# Altium PCB Copy of Motor Controller.PcbDoc (part 2 of 3)
Units mm, origin at the board's own origin, x right, y up, seen from the top; angles counter-clockwise.
Board outline 52 x 52 mm, 6 copper layers (Signal 1, GND1, Signal 2, Power, GND2, Signal 3), stack 1.816 mm thick; 182 components, 97 nets, 695 pads, 1437 vias.
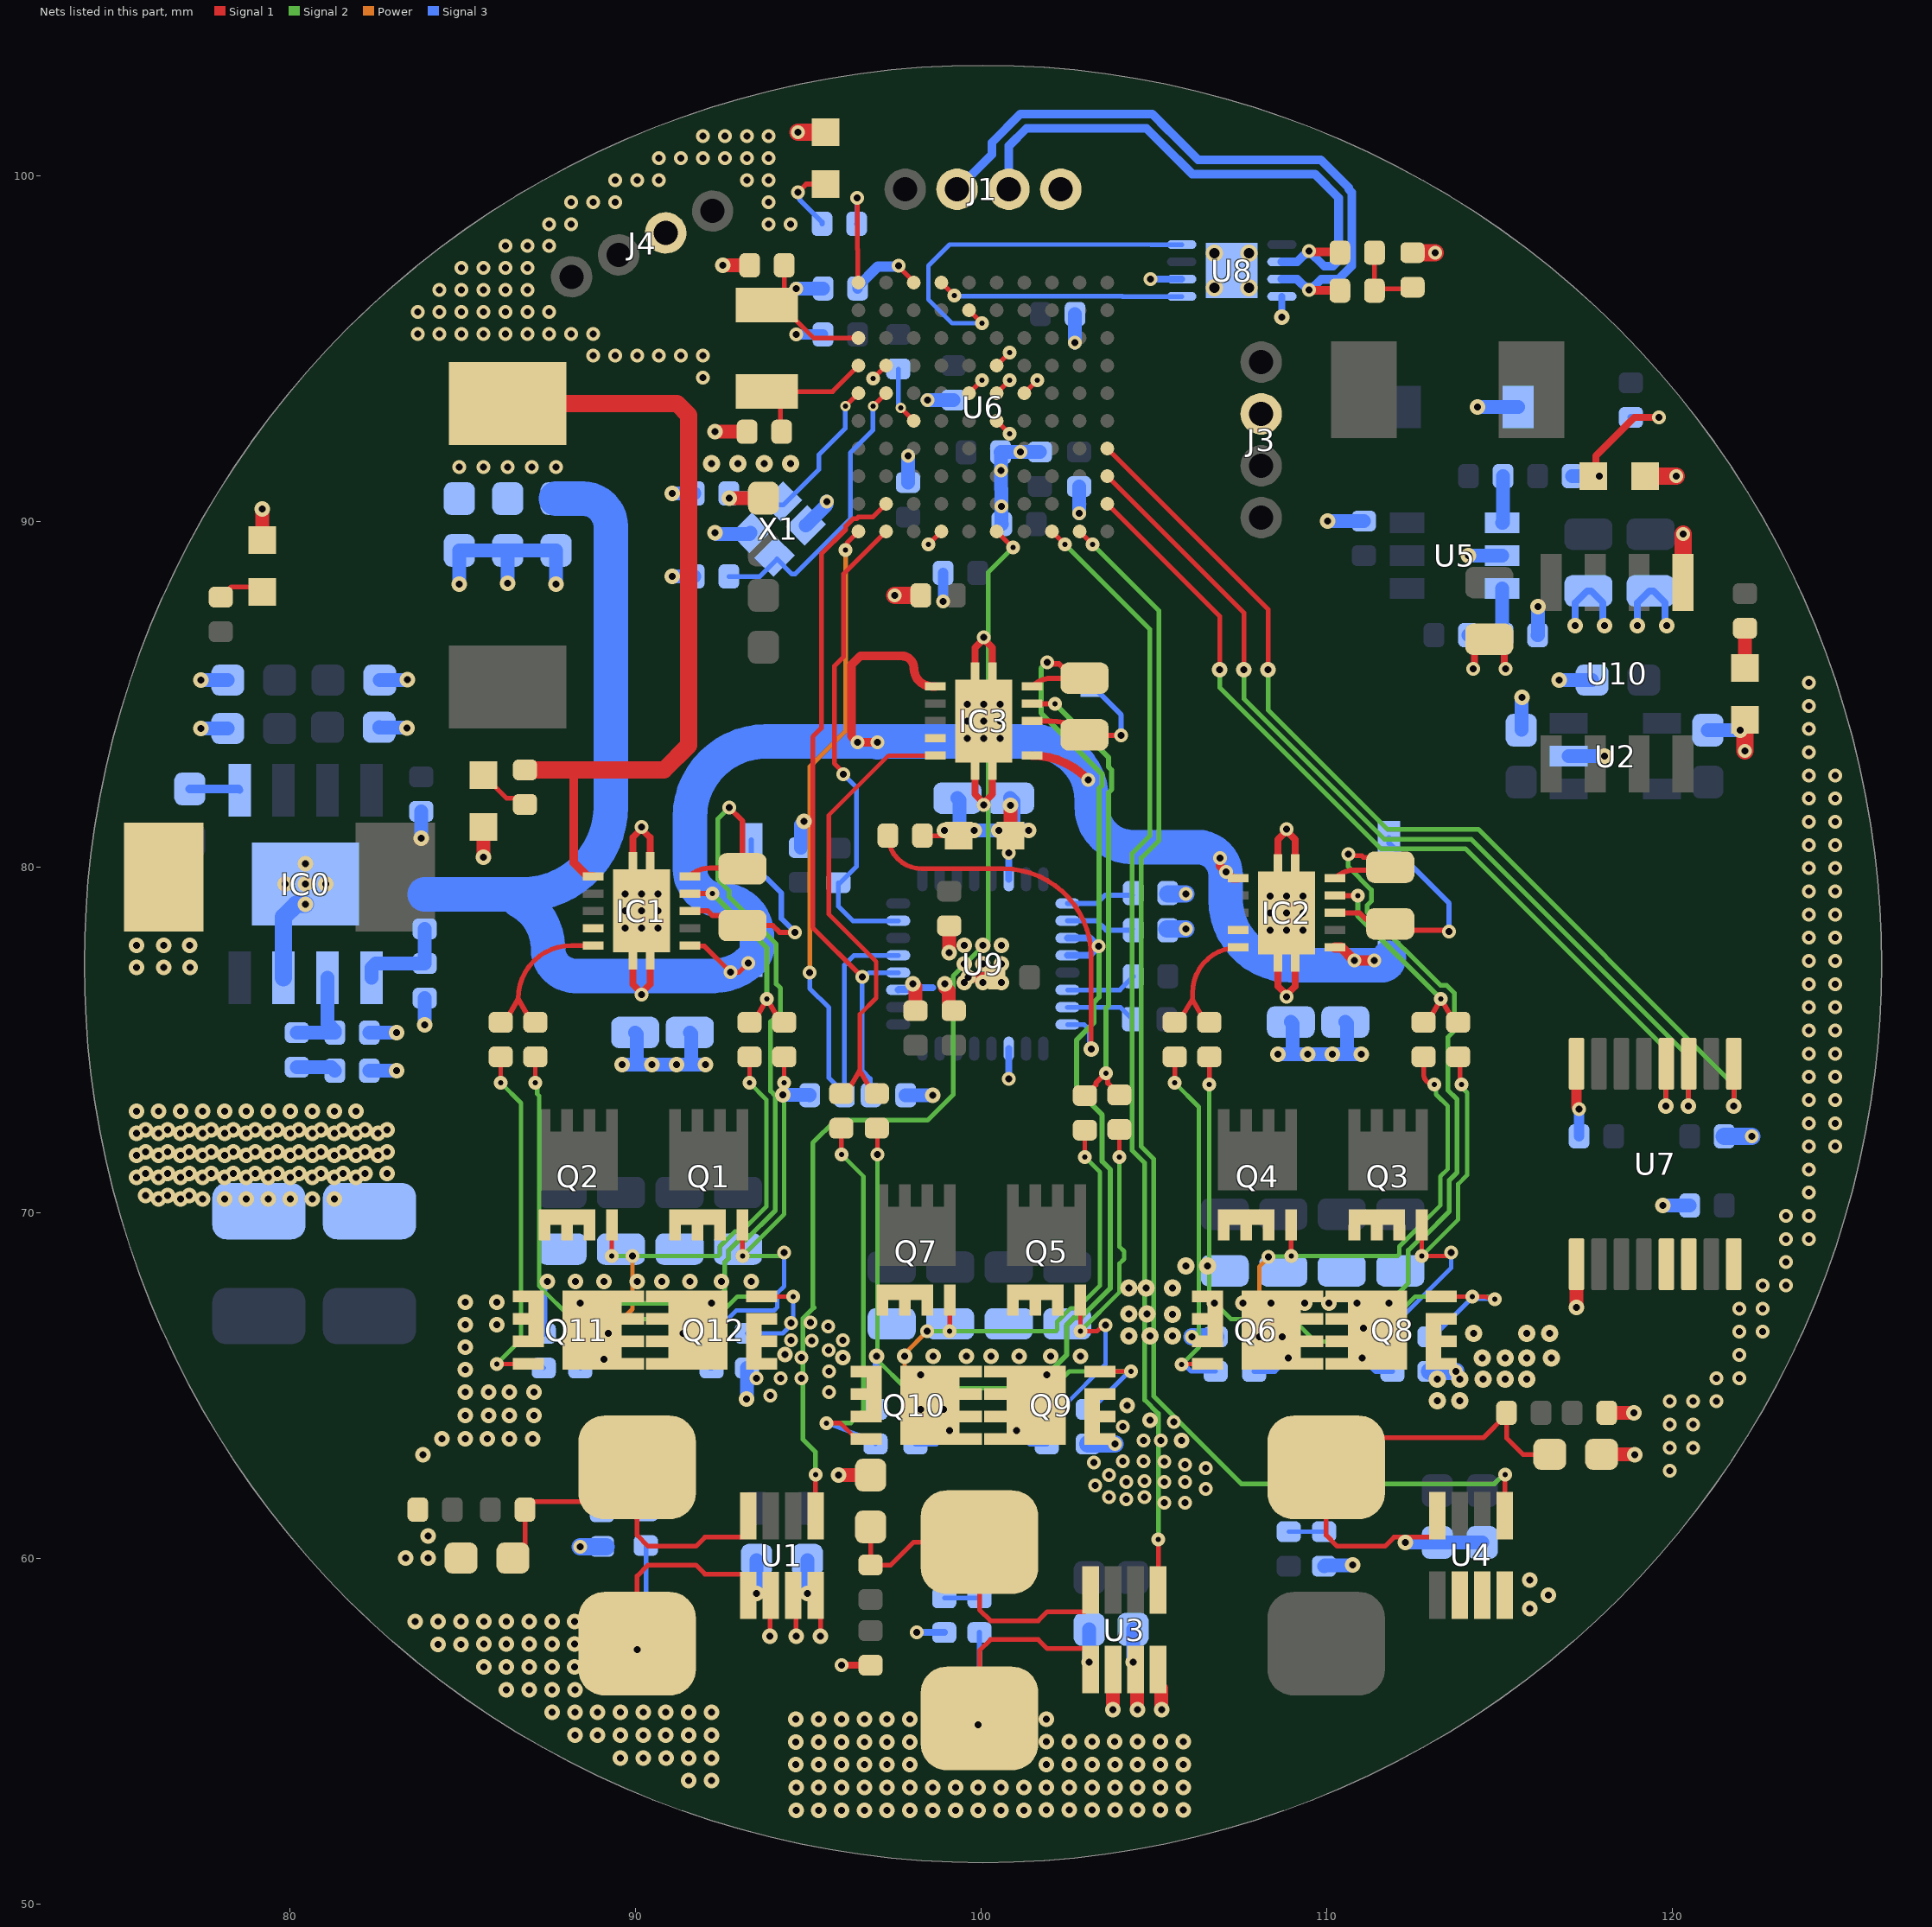
[diagram p6: the nets of this part, all layers, seen from the top]

## Via types
v1: diameter 0.45, hole 0.2, Signal 1 to Signal 3, tented both sides, 210 vias
v2: diameter 0.4, hole 0.2, Signal 1 to Signal 3, tented both sides, 204 vias
v3: diameter 0.45, hole 0.2, Signal 1 to GND1, tented both sides, 168 vias
v4: diameter 0.45, hole 0.2, GND2 to Signal 3, tented both sides, 127 vias
v5: diameter 0.4, hole 0.2, Signal 1 to GND1, tented both sides, 114 vias
v6: diameter 0.4, hole 0.2, Signal 2 to Power, tented both sides, 113 vias
v7: diameter 0.4, hole 0.2, Power to GND2, tented both sides, 100 vias
v8: diameter 0.4, hole 0.2, GND2 to Signal 3, tented both sides, 99 vias
v9: diameter 0.4, hole 0.2, GND1 to Signal 2, tented both sides, 66 vias
v10: diameter 0.4, hole 0.15, Signal 1 to GND1, tented both sides, 62 vias
v11: diameter 0.4, hole 0.15, GND1 to Signal 2, tented both sides, 49 vias
v12: diameter 0.45, hole 0.2, GND1 to Signal 2, tented both sides, 29 vias
v13: diameter 0.5, hole 0.2, Signal 1 to GND1, tented both sides, 25 vias
v14: diameter 0.5/0.5 (per signal layer), hole 0.2, GND2 to Signal 3, tented both sides, 24 vias
v15: diameter 0.45, hole 0.2, Signal 2 to Power, tented both sides, 11 vias
v16: diameter 0.4, hole 0.15, Signal 1 to Signal 3, tented both sides, 9 vias
v17: diameter 0.5, hole 0.2, Signal 1 to Signal 3, 4 vias
v18: diameter 0.5, hole 0.3, Signal 1 to Signal 3, tented both sides, 4 vias
v19: diameter 0.4, hole 0.15, GND2 to Signal 3, tented both sides, 3 vias
v20: diameter 0.3, hole 0.15, Signal 1 to Signal 3, tented both sides, 3 vias
v21: diameter 0.5/0.5 (per signal layer), hole 0.2, GND1 to Signal 2, tented both sides, 2 vias
v22: diameter 0.4, hole 0.2, Signal 1 to Signal 3, 2 vias
v23: diameter 0.4, hole 0.15, Power to GND2, tented both sides, 2 vias
v24: diameter 0.33, hole 0.15, Signal 1 to Signal 3, tented both sides, 2 vias
v25: diameter 0.35, hole 0.15, GND1 to Signal 2, tented both sides, 2 vias
v26: diameter 0.5/0.5 (per signal layer), hole 0.2, Signal 1 to GND1, tented both sides, 1 vias
v27: diameter 0.4, hole 0.2, GND1 to Signal 2, 1 vias
v28: diameter 0.4, hole 0.2, Signal 1 to GND1, 1 vias

## Nets (pads, with @x,y where several pads share a name; then routed paths per layer and width w, separated by ;. In a path a pad name is that pad's centre, name@x,y a point inside that pad or via, vN(x,y) a via of type N, cw(c..) or ccw(c..) an arc to the next point about the centre after c; other vN are vias at no path point) (continued)
+12V: C10.1 C11.1 C12.1 C13.1 C14.1 C15.1 C46.1 C47.1 C48.1 D1.2 D2.2 D3.2 IC1.1 IC1.6 IC2.1 IC2.6 IC3.1 IC3.6 L3.2 R32.2 R34.1 | length 91.5
  Signal 1 w0.138: IC1.1@91.567,77.724 91.585,77.706 91.986,77.706 v2(92.747,76.945) 92.992,76.945 v2(93.261,77.214)
  Signal 1 w0.254: 88.214,82.8 88.214,80.111 88.601,79.724 IC1.6@88.767,79.724 ; v2(97,83.597) 96.997,83.6 v2(96.419,83.6) 96.246,83.773 96.246,85.84 96.506,86.1 97.695,86.1 cw(c97.695,85.74) 98.055,85.74 ccw(c98.578,85.74) 98.578,85.217 IC3.6@98.673,85.217 ; IC3.1@101.473,83.217 cw(c101.473,80.998) 103.042,82.567 v2(103.092,82.517) ; v2(106.906,80.245) 106.906,80.029 107.269,79.666 IC2.6@107.435,79.666
  Signal 1 w0.3: IC2.1@110.235,77.666 110.415,77.666 v2(110.792,77.289) v2(111.368,77.289)
  Signal 1 w0.5: L3.2@86.3,93.4 91.2,93.4 91.54,93.06 91.54,83.517 90.823,82.8 88.214,82.8 R32.2@86.8,82.8
  Signal 3 w1: R34.1@83.9,79.2 86.741,79.2 ccw(c86.741,81.74) 89.281,81.74 89.281,89.839 ccw(c88.47,89.839) 88.47,90.65 C46.1@87.7,90.65 ; 86.64,79.013 cw(c85.896,77.629) 87.467,77.629 ccw(c88.252,77.629) 88.252,76.844 C10.1@89.986,76.844 C11.1@91.567,76.844 92.263,76.844 ccw(c92.263,78.374) D1.2@93.345,77.292 ccw(c92.94,77.697) 93.513,77.697 93.513,78.014 ccw(c92.495,78.014) 92.495,79.032 cw(c92.495,79.96) 91.567,79.96 91.567,81.424 cw(c93.767,81.424) 93.767,83.624 96.973,83.624 v2(97,83.597) 97.027,83.624 C15.1@99.314,83.624 C14.1@100.838,83.624 101.496,83.624 cw(c101.496,81.92) D3.2@103.2,81.92 103.2,81.736 ccw(c104.369,81.736) 104.369,80.567 106.255,80.567 cw(c106.255,79.747) 107.074,79.747 107.074,79.033 ccw(c108.96,79.033) C13.1@108.96,77.147 C12.1@110.535,77.147 111.587,77.147 ccw(c111.587,77.36) D2.2@111.8,77.36
  other v2: 107.088,79.847 84.9,91.567 85.598,91.567 86.3,91.567 86.995,91.567 87.7,91.567
BOOT: C49.1 IC0.1 | length 1.5
  Signal 3 w0.2: IC0.1@78.507,82.25 IC0.1@78.545,82.212
  Signal 3 w0.254: C49.1@77.1,82.25 IC0.1@78.507,82.25
CAN_N: J1.3 R26.2 U8.6 | length 16.6
  Signal 1 w0.254: v22(109.489,97.81) 109.512,97.787 110.356,97.787 R26.2@110.379,97.765
  Signal 3 w0.254: J1.3@100.8,99.6 100.8,100.856 101.308,101.364 104.777,101.364 105.22,100.92 106.101,100.04 109.651,100.04 110.34,99.351 110.34,97.539 110.178,97.377 109.922,97.377 v22(109.489,97.81) 109.45,97.81 109.142,97.502 108.702,97.502 U8.6@108.7,97.5
CAN_P: J1.2 R24.1 U8.7 | length 19
  Signal 1 w0.254: v22(109.489,96.69) 109.502,96.677 110.366,96.677 R24.1@110.379,96.665
  Signal 3 w0.254: J1.2@99.3,99.6 100.309,100.609 100.309,100.95 101.136,101.778 104.948,101.778 105.392,101.334 105.513,101.213 106.272,100.454 109.823,100.454 110.633,99.644 110.633,99.597 110.721,99.509 110.721,97.381 110.336,96.996 109.834,96.996 109.529,96.69 v22(109.489,96.69) 109.45,96.69 109.142,96.998 108.702,96.998 U8.7@108.7,97
CAN_RX: U6.B5 U8.4 | length 10.9
  Signal 1 w0.138: U6.B5@99.647,96.1 v16(100.024,95.723)
  Signal 3 w0.127: v16(100.024,95.723) 99.155,95.723 98.47,96.408 98.47,97.386 99.083,98 104.921,98
  Signal 3 w0.138: 104.921,98 U8.4@105.8,98
CAN_TX: U6.A4 U8.1 | length 7.1
  Signal 1 w0.138: U6.A4@98.847,96.9 v16(99.224,96.523)
  Signal 3 w0.138: v16@99.224,96.511 104.078,96.511 104.09,96.5 U8.1@105.8,96.5
CB1: C53.2 U5.1 | length 1.4
  Signal 3 w0.4: U5.1@115.075,89.95 ccw(c115.075,89.975) 115.1,89.975 C53.2@115.1,91.3
COMP: C57.1 IC0.6 R35.1 | length 2.8
  Signal 3 w0.4: R35.1@80.2,75.2 C57.1@81.3,75.2 81.3,75.25 81.085,75.465 IC0.6@81.085,76.788
CS: R45.2 U6.K2 U9.23 | length 13.9
  Signal 1 w0.138: v2(96.012,82.677) 96.012,82.727 95.75,82.99 95.75,85.801 96.012,86.063 96.012,88.465 96.87,89.323 U6.K2@97.247,89.7
  Signal 3 w0.138: v2(96.012,82.677) 96.388,82.301 96.388,80.002 95.919,79.533 R45.2@95.869,79.533 95.869,78.855 96.288,78.437 U9.23@97.597,78.437
FAULT: R31.2 U6.A1 | length 3.2
  Signal 1 w0.138: v2(96.41,99.35) 96.41,97.875 96.428,97.856 96.428,96.919 U6.A1@96.447,96.9
  Signal 3 w0.138: R31.2@96.393,98.6 96.401,98.608 96.401,99.342 v2(96.41,99.35)
FB: IC0.5 R34.2 R37.1 | length 2.9
  Signal 3 w0.4: IC0.5@82.355,76.788 82.355,77.075 82.48,77.2 R37.1@83.9,77.2 R34.2@83.9,78.2
FB1: R27.2 R28.1 U5.3 | length 2.4
  Signal 3 w0.4: R27.2@114.1,86.7 R28.1@115.1,86.7 cw(c115.1,86.725) 115.075,86.725 U5.3@115.075,88.05
GND: C4.2 C5.2 C6.2 C7.2 C8.2 C9.2 C10.2 C11.2 C12.2 C13.2 C14.2 C15.2 C16.2 C17.2 C18.2 C19.2 C20.2 C21.2 C22.2 C23.2 C24.2 C25.2 C26.2 C27.1 C28.1 C29.2 C30.1 C31.2 C32.2 C33.2 C34.2 C35.2 C36.1 C37.2 C38.1 C39.2 C40.2 C41.2 C42.2 C43.2 C44.2 C45.2 C46.2 C47.2 C48.2 C50.2 C51.2 C52.2 C54.2 C55.2 C56.2 C57.2 C58.2 C59.2 C60.1 C61.1 C62.1 C63.1 C64.1 C65.1 C66.1 C67.2 C68.2 C69.2 C70.2 C71.2 C72.2 C73.2 C74.2 C75.2 C76.2 C77.2 D4.2 D5.2 DS1.2 DS2.2 DS3.2 DS4.2 DS5.2 DS6.2 IC0.7 IC0.9 IC1.9 IC1.11 IC1.12 IC1.13 IC1.14 IC1.15 IC2.9 IC2.11 IC2.12 IC2.13 IC2.14 IC2.15 IC3.9 IC3.11 IC3.12 IC3.13 IC3.14 IC3.15 J1.4 J3.3 J4.3 Q6.1 Q6.2 Q6.3 Q6.10 Q8.1 Q8.2 Q8.3 Q8.10 Q9.1 Q9.2 Q9.3 Q9.10 Q10.1 Q10.2 Q10.3 Q10.10 Q11.1 Q11.2 Q11.3 Q11.10 Q12.1 Q12.2 Q12.3 Q12.10 R17.2 R19.2 R21.2 R28.2 R33.1 R36.2 R37.2 R38.1 R42.2 R43.2 R44.2 R49.1 R50.1 R53.1 R54.1 R57.1 R58.1 U1.2 U1.3 U1.4 U2.2 U3.2 U3.3 U3.4 U4.2 U4.3 U4.4 U5.2 U6.D2 U6.D6 U6.E5 U6.E6 U6.E7 U6.F6 U6.K4 U7.9 U8.2 U8.8 U8.9 U9.3 U9.4 U9.11 U9.19 U9.30 U9.EPAD U10.1 X1.2 X1.4 | length 123.6
  Signal 1 w0.138: v3(93.89,57.732) 93.89,58.902 U1.2@93.909,58.921 ; U1.3@94.559,58.921 94.644,58.836 v3(94.644,57.732) ; U1.4@95.209,58.921 95.348,58.782 v3(95.348,57.732) ; v10(96.87,94.123) U6.D2@97.247,94.5 ; v10(98.47,89.323) U6.K4@98.847,89.7 ; U6.E5@99.647,93.7 v10(100.024,94.077) ; U6.F6@100.447,92.9 v10(100.824,92.523) ; U6.E6@100.447,93.7 v10(100.824,94.077) ; U6.D6@100.447,94.5 v10(100.824,94.877) ; U6.E7@101.247,93.7 v10(101.624,94.077)
  Signal 1 w0.2: IC1.15@89.917,77.274 89.917,76.602 v5@90.167,76.352 ; IC1.14@89.917,80.174 89.917,80.846 v5@90.167,81.096 ; v5(90.167,76.298) v5@90.167,76.352 ; v5(90.167,81.15) v5@90.167,81.096 ; IC1.12@90.417,77.274 90.417,76.602 v5@90.167,76.352 ; IC1.13@90.417,80.174 90.417,80.846 v5@90.167,81.096 ; v5(95.959,56.9) R19.2@96.8,56.9 ; IC3.15@99.823,82.767 99.823,82.095 v5@100.073,81.845 ; IC3.14@99.823,85.667 99.823,86.339 v5@100.073,86.589 ; v5(100.073,81.791) v5@100.073,81.845 ; v5(100.073,86.643) v5@100.073,86.589 ; IC3.12@100.323,82.767 100.323,82.095 v5@100.073,81.845 ; IC3.13@100.323,85.667 100.323,86.339 v5@100.073,86.589 ; IC2.15@108.585,77.216 108.585,76.544 v5@108.835,76.294 ; IC2.14@108.585,80.116 108.585,80.788 v5@108.835,81.038 ; v5(108.835,76.24) v5@108.835,76.294 ; v5(108.835,81.092) v5@108.835,81.038 ; IC2.12@109.085,77.216 109.085,76.544 v5@108.835,76.294 ; IC2.13@109.085,80.116 109.085,80.788 v5@108.835,81.038 ; v5(114.232,85.725) 114.271,85.763 114.271,86.235 114.616,86.58 114.784,86.58 115.129,86.235 115.129,85.763 v5(115.167,85.725)
  Signal 1 w0.3: v3(99.621,76.8) C64.1@100.4,76.8
  Signal 1 w0.4: DS3.2@79.2,89.45 v3(79.2,90.35) ; v3(85.6,80.271) DS5.2@85.6,81.15 ; v3(92.3,92.585) 92.302,92.583 C38.1@93.226,92.583 ; v3(92.521,97.4) C37.2@93.3,97.4 ; v3(92.71,90.665) R38.1@93.702,90.665 ; v3(95.871,62.4) C40.2@96.8,62.4 ; v3(98.028,76.612) 98.028,76.599 98.1,76.526 C62.1@98.1,75.833 ; v3(98.943,76.609) 98.953,76.599 98.953,76.508 99.057,76.404 99.057,75.933 99.157,75.833 C61.1@99.207,75.833 ; v3(99.073,77.51) 99.074,77.512 99.074,78.288 C63.1@99.076,78.289 ; DS6.2@100.85,80.9 v3(100.85,81.779) ; v3(103.815,55.61) U3.2@103.815,56.774 ; U3.3@104.465,56.774 104.505,56.734 104.505,55.637 104.519,55.624 v3(104.519,55.61) ; U3.4@105.115,56.774 105.115,56.329 105.213,56.231 105.213,55.62 v3(105.223,55.61) ; v3(117.225,67.246) U7.9@117.225,68.5 ; C41.2@117.95,63 117.954,62.996 118.9,62.996 v3(118.904,62.992) ; R21.2@118.1,64.2 v3(118.879,64.2)
  Signal 1 w0.5: v5(94.7,101.25) DS4.2@95.5,101.25 ; v5(97.499,87.85) C25.2@98.253,87.85 ; C45.2@112.479,97.765 v5(113.136,97.765) ; DS2.2@119.204,91.304 v5(120.104,91.304) ; U10.1@120.305,88.23 v5(120.305,89.62) ; v5(122.1,83.35) DS1.2@122.1,84.25
  Signal 3 w0.2: R50.1@87.341,66.498 87.341,67.829 87.447,67.935 v4(87.447,68.003) ; R53.1@96.942,64.3 96.957,64.315 96.957,65.829 v4(96.972,65.844) ; U9.19@97.597,76.437 97.616,76.456 98.006,76.456 98.05,76.5 98.6,76.5 ; v8(98.129,57.845) C70.2@98.933,57.845 ; v8(100.797,73.865) U9.11@100.797,74.737 ; U9.30@100.797,79.637 v8(100.797,80.4) ; U9.4@102.497,77.437 103.134,77.437 v8(103.393,77.696) 103.388,77.696 103.147,77.937 U9.3@102.497,77.937 ; v8(104.896,97) U8.2@105.8,97 ; v4(108.7,95.896) U8.8@108.7,96.5 ; C19.2@115.625,83.95 C19.2@115.637,83.963 ; v4@115.637,84.892 v4(115.65,84.904) ; v4(117.19,86.979) 117.19,87.635 117.535,87.98 C44.2@117.569,87.98 117.644,87.98 117.989,87.635 117.989,87.027 v4(118.037,86.979) ; v4(118.99,86.979) 118.99,87.635 119.335,87.98 C43.2@119.369,87.98 119.444,87.98 119.789,87.635 119.789,87.027 v4(119.837,86.979)
  Signal 3 w0.3: v8(94.643,95.4) C28.1@95.421,95.399 ; C30.1@98.9,88.5 98.901,88.499 98.901,87.672 v8(98.902,87.671)
  Signal 3 w0.4: v4(77.421,84) C52.2@78.2,84 ; v4(77.421,85.4) C51.2@78.2,85.4 ; C58.2@82.3,74.1 v4(83.079,74.1) ; C57.2@82.3,75.2 v4(83.079,75.2) ; C50.2@82.581,84.036 82.591,84.027 83.37,84.027 v4(83.379,84.018) ; C56.2@82.6,85.4 82.606,85.406 83.385,85.406 v4(83.392,85.413) ; v4(83.8,80.821) R36.2@83.8,81.6 ; v4(83.9,75.421) R37.2@83.9,76.2 ; v4(84.9,88.171) C48.2@84.9,89.15 C47.2@86.3,89.15 ; v4(86.3,88.2) C47.2@86.3,89.15 ; v4(87.7,88.171) C46.2@87.7,89.15 C47.2@86.3,89.15 ; v4(89.611,74.27) 90.04,74.27 ; C10.2@89.986,75.204 90.04,75.15 90.04,74.27 ; v4(91.059,88.4) C36.1@91.7,88.4 ; v4(91.059,90.805) 91.062,90.802 91.698,90.802 C35.2@91.7,90.8 ; C11.2@91.567,75.204 91.605,75.166 91.605,74.27 ; v4(92.024,74.27) 91.605,74.27 ; v4(92.3,89.662) 92.314,89.662 92.349,89.627 93.293,89.627 X1.2@93.328,89.662 ; v4(93.211,64.6) 93.218,64.606 93.218,65.492 R49.1@93.224,65.498 ; v4(93.499,58.981) C16.2@93.499,59.935 ; v4(94.261,73.4) 94.267,73.395 95.035,73.395 R43.2@95.04,73.389 ; v8(94.646,96.731) R33.1@95.425,96.731 ; R42.2@94.782,80.554 94.782,81.212 94.869,81.298 v4(94.869,81.312) ; X1.4@94.926,89.875 95.523,90.472 95.523,90.558 v8(95.533,90.568) ; v4(94.969,58.981) C17.2@94.969,59.935 ; R44.2@97.815,73.389 v4(98.6,73.389) ; C29.2@97.883,91.114 v8(97.883,91.893) ; v8(98.448,93.5) C34.2@99.2,93.5 ; v4(98.939,81.05) 99.368,81.05 ; C15.2@99.314,81.984 99.368,81.93 99.368,81.05 ; C27.1@100.592,89.916 100.582,89.926 100.582,90.922 100.567,90.937 100.567,91.984 C33.2@100.561,91.99 100.566,91.995 101.695,91.995 C26.2@101.7,92 ; C14.2@100.838,81.984 100.933,81.889 100.933,81.077 ; v4(101.374,81.053) 101.365,81.063 100.947,81.063 100.933,81.077 ; v8(102.715,95.163) C31.2@102.715,95.992 ; v8(102.833,90.221) C32.2@102.833,91 ; v4(103.124,56.982) C23.2@103.124,57.936 ; v4(104.394,56.982) C24.2@104.394,57.936 ; v4(108.585,74.573) 109.014,74.573 ; C13.2@108.96,75.507 109.014,75.453 109.014,74.573 ; C71.2@109.919,59.762 109.948,59.79 110.739,59.79 v4(110.748,59.8) ; v4(110.022,90) C55.2@111.072,90 ; C12.2@110.535,75.507 110.579,75.463 110.579,74.573 ; v4(110.998,74.573) 110.579,74.573 ; v4(112.269,60.451) C21.2@113.198,60.451 C22.2@114.5,60.45 ; v4(114.096,89) U5.2@115.075,89 ; v4(114.356,93.3) D5.2@115.535,93.3 ; C19.2@115.637,83.963 v4@115.637,84.892 ; R28.2@116.1,86.7 116.106,86.706 116.106,87.523 v4(116.113,87.529) ; v4(116.721,85.4) C18.2@117.675,85.4 ; U2.2@117,83.2 v4(118.029,83.2) ; C54.2@117.1,91.3 117.102,91.302 117.877,91.302 v4(117.879,91.304) ; v4(119.721,70.2) C60.1@120.5,70.2 ; C20.2@121.025,83.95 v4(121.954,83.95) ; 90.04,74.27 v4(90.469,74.27) v4(91.187,74.27) 91.605,74.27 ; 99.368,81.05 99.797,81.05 v4(100.515,81.05) 100.524,81.06 100.916,81.06 100.933,81.077 ; 109.014,74.573 109.443,74.573 v4(110.161,74.573) 110.579,74.573
  Signal 3 w0.5: IC0.7@79.815,76.788 79.815,78.55 80.175,78.91 v4(80.45,78.91) ; v8(88.4,60.325) C69.2@89.145,60.325 ; R54.1@103.089,63.3 v8(103.866,63.3) ; C65.1@105.369,78.197 v8(105.918,78.197) ; C66.1@105.398,79.208 v8(105.918,79.208) ; v8(106.096,66.4) R58.1@106.783,66.4 ; R57.1@112.973,65.4 v8(113.736,65.4) ; C59.2@121.5,72.2 v8(122.3,72.2)
  other v2: 119.928,62.522 119.928,63.192 120.599,63.192 119.928,63.863 120.599,63.863 119.928,64.534 120.599,64.534 121.269,64.534 121.269,65.204 121.94,65.204 121.94,65.875 121.94,66.546 122.611,66.546 121.94,67.216 122.611,67.216 122.611,67.887 123.281,67.887 123.281,68.558 123.281,69.228 123.952,69.228 123.281,69.899 123.952,69.899 123.952,70.57 123.952,71.24 123.952,71.911 124.714,71.911 123.952,72.581 124.714,72.581 123.952,73.252 124.714,73.252 123.952,73.923 124.714,73.923 123.952,74.593 124.714,74.593 123.952,75.264 124.714,75.264 123.952,75.935 124.714,75.935 123.952,76.605 124.714,76.605 123.952,77.276 124.714,77.276 123.952,77.947 124.714,77.947 123.952,78.617 124.714,78.617 123.952,79.288 124.714,79.288 123.952,79.959 124.714,79.959 123.952,80.629 124.714,80.629 123.952,81.3 124.714,81.3 123.952,81.971 124.714,81.971 123.952,82.641 124.714,82.641 123.952,83.312 123.952,83.983 123.952,84.653 123.952,85.324 91.948,94.147 88.773,94.782 89.408,94.782 90.043,94.782 90.678,94.782 91.313,94.782 91.948,94.782 83.693,95.417 84.328,95.417 84.963,95.417 85.598,95.417 86.233,95.417 86.868,95.417 87.503,95.417 88.138,95.417 88.773,95.417 83.693,96.052 84.328,96.052 84.963,96.052 85.598,96.052 86.233,96.052 86.868,96.052 87.503,96.052 84.328,96.687 84.963,96.687 85.598,96.687 86.233,96.687 86.868,96.687 84.963,97.322 85.598,97.322 86.233,97.322 86.868,97.322 86.233,97.957 86.868,97.957 87.503,97.957 87.503,98.592 88.138,98.592 93.853,98.592 94.488,98.592 88.138,99.227 88.773,99.227 89.408,99.227 93.853,99.227 89.408,99.862 90.043,99.862 90.678,99.862 93.218,99.862 93.853,99.862 90.678,100.497 91.313,100.497 91.948,100.497 92.583,100.497 93.218,100.497 93.853,100.497 91.948,101.132 92.583,101.132 93.218,101.132 93.853,101.132
  other v3: 115.873,58.534 116.409,58.929 115.873,59.366 83.35,60 84,60 84,60.633 83.85,62.992 105.8,63.4 84.4,63.454 85.07,63.454 85.715,63.454 86.35,63.454 87.025,63.454 104.881,63.983 85.075,64.121 85.746,64.121 86.35,64.121 87.056,64.121 104.225,64.416 85.075,64.8 85.746,64.8 86.35,64.8 87.056,64.8 85.075,65.448 96,65.8 94.323,65.886 85.075,66.101 85.075,66.748 85.978,66.748 85.075,67.398 85.978,67.398 76.2,70.383 76.835,70.383 77.47,70.383 78.105,70.383 78.74,70.383 79.375,70.383 80.01,70.383 80.645,70.383 81.28,70.383 75.565,71.018 76.2,71.018 76.835,71.018 77.47,71.018 78.105,71.018 78.74,71.018 79.375,71.018 80.01,71.018 80.645,71.018 81.28,71.018 81.915,71.018 75.565,71.653 76.2,71.653 76.835,71.653 77.47,71.653 78.105,71.653 78.74,71.653 79.375,71.653 80.01,71.653 80.645,71.653 81.28,71.653 81.915,71.653 82.55,71.653 75.565,72.288 76.2,72.288 76.835,72.288 77.47,72.288 78.105,72.288 78.74,72.288 79.375,72.288 80.01,72.288 80.645,72.288 81.28,72.288 81.915,72.288 82.55,72.288 75.565,72.923 76.2,72.923 76.835,72.923 77.47,72.923 78.105,72.923 78.74,72.923 79.375,72.923 80.01,72.923 80.645,72.923 81.28,72.923 81.915,72.923 75.565,77.089 76.342,77.089 77.111,77.089 75.565,77.724 76.342,77.724 77.1,77.724 108.36,78.166 108.835,78.166 109.31,78.166 89.692,78.224 90.167,78.224 90.642,78.224 108.36,78.666 108.835,78.666 109.31,78.666 89.692,78.724 90.167,78.724 90.642,78.724 108.36,79.153 108.835,79.153 109.31,79.153 89.692,79.211 90.167,79.211 90.642,79.211 99.598,83.717 100.073,83.717 100.548,83.717 99.598,84.217 100.073,84.217 100.548,84.217 99.598,84.704 100.073,84.704 100.548,84.704
  other v4: 97.79,65.844 98.607,65.844 99.575,65.844 100.279,65.844 101.092,65.844 102.014,65.844 102.877,65.844 106.751,67.374 107.569,67.374 108.386,67.374 109.354,67.374 110.058,67.374 110.871,67.374 111.793,67.374 88.265,68.003 89.082,68.003 90.05,68.003 90.754,68.003 91.567,68.003 92.489,68.003 93.352,68.003 75.819,70.485 76.454,70.485 77.089,70.485 75.819,71.12 76.454,71.12 77.089,71.12 77.724,71.12 78.359,71.12 78.994,71.12 79.629,71.12 80.264,71.12 80.899,71.12 81.534,71.12 82.169,71.12 82.804,71.12 75.819,71.755 76.454,71.755 77.089,71.755 77.724,71.755 78.359,71.755 78.994,71.755 79.629,71.755 80.264,71.755 80.899,71.755 81.534,71.755 82.169,71.755 82.804,71.755 75.819,72.39 76.454,72.39 77.089,72.39 77.724,72.39 78.359,72.39 78.994,72.39 79.629,72.39 80.264,72.39 80.899,72.39 81.534,72.39 82.169,72.39 82.804,72.39 109.443,74.573 99.511,76.645 100.05,76.645 100.59,76.645 99.511,77.185 100.05,77.185 100.59,77.185 99.511,77.724 100.05,77.724 100.59,77.724 79.86,79.5 80.45,79.5 81.04,79.5 80.45,80.09 99.797,81.05
  other v5: 105.3,61.6 105.9,61.6 104.202,61.702 103.695,61.766 104.722,61.766 106.5,62 103.3,62.1 104.2,62.2 105.3,62.2 105.9,62.2 104.719,62.219 103.7,62.4 106.5,62.6 105.9,62.7 103.26,62.766 104.1,62.8 104.7,62.8 105.292,62.792 104.7,63.4 105.2,63.4 104.1,63.8 105.566,63.943 93.9,64.7 95.6,64.8 93.5,65.2 94.2,65.2 94.8,65.2 95.6,65.4 94.8,65.8 95.58,66.016 94.5,66.3 95.102,66.284 96,66.3 95.575,66.699 94.5,66.8 95.06,66.81
  other v8: 100.582,90.424 100.567,91.461 101.131,91.995
  other v13: 113.198,64.55 113.848,64.55 113.198,65.171 113.848,65.171 114.528,65.171 115.159,65.171 115.787,65.171 114.503,65.788 115.159,65.788 115.787,65.788 116.5,65.788 104.267,66.421 104.881,66.427 105.537,66.421 114.25,66.5 115.787,66.5 116.45,66.5 104.277,67.066 104.799,67.066 105.537,67.056 104.267,67.818 104.775,67.818 105.537,67.818 105.918,68.453 106.553,68.453
  other v17: 92.202,91.669 92.964,91.669 93.726,91.669 94.488,91.669
  other v18: 106.75,96.75 107.75,96.75 106.75,97.75 107.75,97.75
HAL_A/ENC_A: U6.G10 U7.1 | length 29.3
  Signal 1 w0.138: U6.G10@103.647,92.1 108.3,87.447 v1(108.3,85.7) ; v1(121.775,73.071) U7.1@121.775,74.3
  Signal 2 w0.138: v1(108.3,85.7) 108.3,84.534 111.747,81.087 114.381,81.087 121.775,73.692 v1(121.775,73.071)
HAL_A/ENC_A/IN: U7.16
HAL_B/ENC_B: U6.H10 U7.3 | length 27.9
  Signal 1 w0.138: U6.H10@103.647,91.3 107.6,87.347 v1(107.6,85.7) ; v1(120.455,73.071) 120.465,73.081 120.465,74.29 U7.3@120.475,74.3
  Signal 2 w0.138: v1(107.6,85.7) 107.6,84.859 111.67,80.79 114.182,80.79 120.455,74.516 v1(120.455,73.071)
HAL_B/ENC_B/IN: U7.14
HAL_C/ENC_I: U6.J10 U7.4 | length 26.8
  Signal 1 w0.138: U6.J10@103.647,90.5 106.9,87.247 v1(106.9,85.7) ; v1(119.805,73.071) 119.815,73.081 119.815,74.29 U7.4@119.825,74.3
  Signal 2 w0.138: v1(106.9,85.7) 106.9,85.185 111.56,80.525 114.006,80.525 119.805,74.726 v1(119.805,73.071)
HAL_C/ENC_I/IN: U7.13
HO1: IC1.4 R1.2 R3.2 | length 6.1
  Signal 1 w0.151: IC1.4@91.567,79.224 v10(92.226,79.224) ; R3.2@93.3,75.5 93.5,75.65 v11(93.8,76.174) 94.1,75.65 R1.2@94.3,75.5
  Signal 2 w0.151: v10(92.226,79.224) 93.8,77.649 v11(93.8,76.174)
  other v10: 93.8,76.174
  other v11: 92.226,79.224
HO2: IC3.4 R9.2 R10.2 | length 13.8
  Signal 1 w0.151: IC3.4@101.473,84.717 v11(102.132,84.717) ; R10.2@103.001,73.379 103.011,73.379 103.321,73.689 103.321,73.749 103.592,74.02 v10(103.615,74.02) 103.662,73.973 103.662,73.738 103.771,73.629 103.771,73.619 103.99,73.4 R9.2@104,73.4
  Signal 2 w0.151: v11(102.132,84.717) 103.688,83.161 103.688,82.884 103.772,82.799 103.772,82.235 103.688,82.15 103.688,75.987 103.615,75.914 v10(103.615,74.02)
  other v10: 102.132,84.717
  other v11: 103.615,74.02
HO3: IC2.4 R2.2 R4.2 | length 6.4
  Signal 1 w0.151: IC2.4@110.235,79.166 v11(110.894,79.166) ; R4.2@112.8,75.5 113,75.65 v10(113.3,76.174) 113.6,75.65 R2.2@113.8,75.5
  Signal 2 w0.151: v11(110.894,79.166) 110.894,78.58 v10(113.3,76.174)
  other v10: 110.894,79.166
  other v11: 113.3,76.174
HS1: C1.1 C39.1 IC1.5 Q1.1 Q1.2 Q1.3 Q1.10 Q2.1 Q2.2 Q2.3 Q2.10 Q11.5 Q11.6 Q11.7 Q11.8 Q11.9 Q12.5 Q12.6 Q12.7 Q12.8 Q12.9 R13.2 R16.1 R47.1 R48.1 U1.8 | length 37
  Signal 1 w0.138: C39.1@86.45,60 86.45,60.06 86.8,60.41 R16.1@86.8,61.4 ; R16.1@86.8,61.406 87.025,61.631 89.053,61.631 R13.2@90.043,62.621 90.043,60.662 90.363,60.342 91.743,60.342 92.006,60.605 93.088,60.605 93.259,60.776 U1.8@93.259,61.221
  Signal 1 w0.151: IC1.5@91.567,79.724 cw(c92.144,79.147) 92.144,79.963 C1.1@93.082,79.963 ; v2(92.71,81.712) 93.091,81.331 C1.1@93.091,79.941
  Signal 2 w0.138: v2(88.4,67.374) v2(92.2,67.374) 92.58,67.754 92.58,68.56 92.695,68.675 92.695,68.903 92.983,69.191 93.176,69.191 94.041,70.055 94.041,73.372 93.904,73.509 93.904,75.514 94.196,75.806 94.196,76.487 94.072,76.611 94.072,77.762 92.697,79.136 92.697,79.312 92.381,79.629 92.381,81.382 v2(92.71,81.712)
  Signal 3 w0.138: R47.1@88.4,65.498 88.581,65.679 88.936,65.679 89.011,65.754 v2(89.082,65.754) ; v2(91.377,66.498) 91.427,66.448 91.427,66.221 92.15,65.498 R48.1@92.2,65.498
HS2: C3.1 C40.1 IC3.5 Q5.1 Q5.2 Q5.3 Q5.10 Q7.1 Q7.2 Q7.3 Q7.10 Q9.5 Q9.6 Q9.7 Q9.8 Q9.9 Q10.5 Q10.6 Q10.7 Q10.8 Q10.9 R14.2 R18.1 R51.1 R52.1 U3.8 | length 38.5
  Signal 1 w0.138: C40.1@96.8,60.9 R18.1@96.8,59.8 97.38,59.8 98.042,60.462 R14.2@99.949,60.462 99.949,58.503 100.269,58.183 101.649,58.183 101.912,58.446 102.994,58.446 103.165,58.617 U3.8@103.165,59.062
  Signal 1 w0.151: IC3.5@101.473,85.217 cw(c102.05,84.64) 102.05,85.456 C3.1@102.988,85.456 102.666,85.456 102.253,85.869 101.951,85.869 v2(101.904,85.917)
  Signal 2 w0.151: v2(101.894,65.301) 102.467,65.874 102.467,66.729 102.703,66.965 102.896,66.965 103.734,67.802 103.734,71.242 103.501,71.475 103.501,72.817 102.755,73.563 102.755,74.984 103.261,75.489 103.261,76.083 103.41,76.232 103.41,82.265 103.495,82.35 103.495,82.684 101.729,84.449 101.729,85.742 v2(101.904,85.917)
  Signal 3 w0.151: R51.1@98.1,63.3 98.695,63.3 v2(99.081,63.686) ; v2(101.02,63.686) 101.406,63.3 R52.1@101.9,63.3
  other v2: 98.25,65.301
HS3: C2.1 C41.1 IC2.5 Q3.1 Q3.2 Q3.3 Q3.10 Q4.1 Q4.2 Q4.3 Q4.10 Q6.5 Q6.6 Q6.7 Q6.8 Q6.9 Q8.5 Q8.6 Q8.7 Q8.8 Q8.9 R15.2 R20.1 R55.1 R56.1 U4.8 | length 35.8
  Signal 1 w0.138: v2(110.617,80.366) 110.667,80.316 111.014,80.316 111.055,80.274 111.547,80.274 C2.1@111.835,79.986 ; U4.8@113.198,61.221 113.198,60.776 113.027,60.605 111.945,60.605 111.682,60.342 110.302,60.342 109.982,60.662 R15.2@109.982,62.621 110.983,63.622 111.123,63.481 114.531,63.481 R20.1@115.2,64.15 ; R20.1@115.2,64.2 115.2,63.474 115.674,63 C41.1@116.45,63 C41.1@116.456,62.994
  Signal 1 w0.151: IC2.5@110.235,79.666 cw(c110.812,79.089) 110.812,79.905 C2.1@111.75,79.905
  Signal 2 w0.138: v2(110.617,80.366) 110.617,80.002 111.29,79.33 111.29,79.002 111.165,78.877 111.165,78.693 113.287,76.57 113.464,76.57 113.696,76.338 113.696,75.262 113.502,75.068 113.502,73.536 113.769,73.269 113.769,71.157 113.541,70.929 113.541,70.027 112.818,69.304 112.756,69.304 112.354,68.903 112.354,67.953 v2(111.058,66.656)
  Signal 3 w0.151: R55.1@107.9,65.4 108.495,65.4 v2(108.881,65.786) ; v2(111.02,65.786) 111.406,65.4 R56.1@111.9,65.4
IA: U1.5 U6.K6 | length 33
  Signal 1 w0.138: U1.5@95.209,61.221 v10(95.209,62.407) ; U6.K6@100.447,89.7 100.907,89.24 v10(100.923,89.24)
  Signal 2 w0.138: v10(95.209,62.407) 95.209,63.064 94.837,63.436 94.837,66.926 95.16,67.249 95.123,67.286 95.123,72.009 95.779,72.665 98.446,72.665 99.187,73.406 99.187,76.835 100.198,77.846 100.198,88.515 v10(100.923,89.24)
  other v11: 95.209,62.407 100.923,89.24
IB: U3.5 U6.K8 | length 32.3
  Signal 1 w0.138: U6.K8@102.047,89.694 U6.K8@102.047,89.7 ; U6.K8@102.047,89.697 v10(102.424,89.32) ; U3.5@105.126,59.085 v10(105.126,60.532)
  Signal 2 w0.138: v10(102.424,89.32) 104.881,86.864 104.881,80.895 104.369,80.383 104.369,71.791 104.731,71.429 104.731,64.571 105.126,64.176 v10(105.126,60.532)
  other v11: 105.126,60.532 102.424,89.32
IC: U4.5 U6.K9 | length 38.8
  Signal 1 w0.138: U6.K9@102.847,89.7 v10(103.224,89.323) ; U4.5@115.159,61.24 v10(115.159,62.415)
  Signal 2 w0.138: v10(103.224,89.323) 105.145,87.402 105.145,80.765 104.633,80.253 104.633,71.901 104.996,71.539 104.996,64.681 107.527,62.15 114.849,62.15 115.114,62.415 v10(115.159,62.415)
  other v11: 115.159,62.415 103.224,89.323
LO1: IC1.10 R5.2 R7.2 | length 4.8
  Signal 1 w0.138: 86.6,76.174 cw(c88.149,76.174) 88.149,77.724 IC1.10@88.767,77.724
  Signal 1 w0.151: R5.2@86.1,75.5 86.3,75.65 86.6,76.174 86.9,75.65 R7.2@87.1,75.5
LO2: IC3.10 R11.2 R12.2 | length 13.7
  Signal 1 w0.127: R12.2@95.951,73.433 R12.2@95.972,73.455 ; 96.49,74.132 96.49,75.731 96.959,76.201 96.959,77.255 95.591,78.623 95.591,81.491 97.317,83.217 IC3.10@98.673,83.217
  Signal 1 w0.151: R12.2@95.983,73.435 96.183,73.585 96.482,74.109 96.783,73.585 R11.2@96.983,73.435
LO3: IC2.10 R6.2 R8.2 | length 4
  Signal 1 w0.138: R6.2@105.6,75.5 105.8,75.65 106.111,76.168 ; R8.2@106.6,75.5 106.4,75.65 106.111,76.168 ; IC2.10@107.435,77.666 ccw(c107.435,76.342) 106.111,76.342 106.111,76.168
MISO: R44.1 U6.J2 U9.20 | length 20.1
  Signal 1 w0.138: v2(96.559,76.807) 95.123,78.243 95.123,83.758 95.377,84.012 95.377,89.056 96.078,89.757 96.078,89.853 96.294,90.069 96.39,90.069 96.444,90.123 96.87,90.123 U6.J2@97.247,90.5
  Signal 3 w0.138: R44.1@96.815,73.389 96.79,73.414 96.79,73.865 96.559,74.096 v2(96.559,76.807) 96.63,76.807 96.76,76.937 U9.20@97.597,76.937
MOSI: R43.1 U6.K1 U9.21 | length 22.8
  Signal 1 w0.138: v16(96.073,89.164) 96.123,89.214 96.123,89.376 U6.K1@96.447,89.7
  Power w0.138: v2(95.035,76.937) 95.035,82.891 96.073,83.929 v16(96.073,89.164)
  Signal 3 w0.138: v2(95.035,76.937) 95.035,76.48 95.591,75.923 95.591,73.888 96.04,73.439 R43.1@96.04,73.389 96.04,77.156 96.322,77.437 U9.21@97.597,77.437
NetC1_2: C1.2 D1.1 IC1.3 | length 6.5
  Signal 1 w0.151: IC1.3@91.567,78.724 92.088,78.724 92.226,78.587 92.805,78.587 C1.2@93.091,78.301 93.969,78.301 94.165,78.105 v2(94.615,78.105)
  Signal 3 w0.151: D1.1@93.345,80.772 93.345,80.112 94.215,79.241 94.215,78.505 v2(94.615,78.105)
NetC2_2: C2.2 D2.1 IC2.3 | length 6.8
  Signal 1 w0.151: IC2.3@110.235,78.666 110.946,78.666 111.311,78.301 C2.2@111.633,78.301 ; C2.2@111.835,78.346 112.019,78.162 113.506,78.162 v2(113.538,78.13)
  Signal 3 w0.151: D2.1@111.8,80.84 111.8,80.68 113.538,78.942 v2(113.538,78.13)
NetC3_2: C3.2 D3.1 IC3.3 | length 4.6
  Signal 1 w0.151: IC3.3@101.473,84.217 102.02,84.217 cw(c102.02,82.848) C3.2@102.988,83.816 103.007,83.797 v2(104.05,83.797)
  Signal 3 w0.151: D3.1@103.2,85.4 103.2,85.24 104.05,84.39 v2(104.05,83.797)
NetC35_1: C35.1 U6.E1 X1.1 | length 5.8
  Signal 1 w0.138: v20(96.07,93.323) U6.E1@96.447,93.7
  Signal 3 w0.138: C35.1@92.7,90.8 93.48,90.8 93.817,90.464 94.271,90.464 94.306,90.499 95.298,91.491 95.298,91.916 96.07,92.687 v20(96.07,93.323)
NetC36_2: C36.2 U6.E2 X1.3 | length 8.6
  Signal 1 w0.138: v20(96.87,93.323) U6.E2@97.247,93.7
  Signal 3 w0.138: C36.2@92.7,88.4 93.593,88.4 94.094,88.901 94.527,88.468 94.611,88.468 96.21,90.067 96.21,91.975 96.87,92.634 v20(96.87,93.323)
NetC37_1: C37.1 U6.C1 X2.2 | length 3.8
  Signal 1 w0.138: C37.1@94.3,97.4 94.3,96.35 94.2,96.25 95.15,95.3 U6.C1@96.447,95.3
NetC38_2: C38.2 U6.D1 X2.1 | length 4.2
  Signal 1 w0.138: C38.2@94.187,92.637 94.187,93.363 X2.1@93.8,93.75 95.697,93.75 U6.D1@96.447,94.5
NetC45_1: C45.1 R24.2 R26.1 | length 2.2
  Signal 1 w0.138: R26.1@111.379,97.765 R24.2@111.379,96.665 111.429,96.715 112.429,96.715 C45.1@112.479,96.765
NetC58_1: C58.1 R35.2 | length 1.1
  Signal 3 w0.4: R35.2@80.2,74.2 81.2,74.2 C58.1@81.3,74.1
NetC65_2: C65.2 U9.2 | length 2
  Signal 3 w0.151: U9.2@102.497,78.437 103.344,78.437 103.615,78.166 104.338,78.166 C65.2@104.369,78.197
NetC66_2: C66.2 U9.1 | length 2
  Signal 3 w0.151: U9.1@102.497,78.937 103.344,78.937 103.584,79.177 C66.2@104.369,79.177
NetC69_1: C69.1 R59.2 | length 0.9
  Signal 3 w0.127: C69.1@89.145,61.325 R59.2@90.043,61.325
NetC70_1: C70.1 R60.2 | length 1
  Signal 3 w0.127: C70.1@98.933,58.845 R60.2@99.949,58.845
NetC71_1: C71.1 R61.2 | length 1
  Signal 3 w0.127: R61.2@108.899,60.762 C71.1@109.919,60.762
NetDS1_1: DS1.1 R25.1 | length 1.2
  Signal 1 w0.4: DS1.1@122.1,85.75 R25.1@122.1,86.9
NetDS2_1: DS2.1 R29.1 | length 3.7
  Signal 1 w0.2: DS2.1@117.704,91.304 117.787,91.387 117.787,91.887 118.9,93 v2(119.604,93)
  Signal 3 w0.2: R29.1@118.8,93 v2(119.604,93)
NetDS3_1: DS3.1 R30.1 | length 1.4
  Signal 1 w0.138: R30.1@78,87.8 78.3,88.1 79.05,88.1 DS3.1@79.2,87.95
NetDS4_1: DS4.1 R31.1 | length 2.1
  Signal 1 w0.151: v2(94.7,99.514) 94.936,99.75 DS4.1@95.5,99.75
  Signal 3 w0.151: v2(94.7,99.514) 94.748,99.466 94.748,99.295 95.393,98.65 R31.1@95.393,98.6
NetDS5_1: DS5.1 R32.1 | length 1.6
  Signal 1 w0.138: DS5.1@85.6,82.65 86.269,81.981 86.619,81.981 R32.1@86.8,81.8
NetDS6_1: DS6.1 R41.1 | length 1.1
  Signal 1 w0.138: R41.1@98.3,80.9 DS6.1@99.35,80.9
NetQ1_4: Q1.4 R1.1 R48.2 | length 12.3
  Signal 1 w0.127: v10(93.091,68.739) Q1.4@93.091,69.643 ; v10(94.3,73.746) R1.1@94.3,74.5
  Signal 2 w0.127: v2(94.3,68.843) 94.196,68.739 v10(93.091,68.739) 94.3,69.948 v10(94.3,73.746)
  Signal 3 w0.127: R48.2@92.2,66.498 92.25,66.498 92.916,67.164 94.012,67.164 94.102,67.254 94.102,67.666 94.3,67.864 v2(94.3,68.843)
  other v11: 93.091,68.739 94.3,73.746
NetQ2_4: Q2.4 R3.1 R47.2 | length 14
  Signal 1 w0.127: v11(89.311,68.739) Q2.4@89.311,69.643 ; v10(93.3,73.746) R3.1@93.3,74.5
  Signal 2 w0.127: v11(89.311,68.739) v6(89.907,68.739) 92.392,68.739 92.436,68.782 92.436,69.01 92.876,69.45 93.069,69.45 93.781,70.163 93.781,73.265 v10(93.3,73.746)
  Power w0.127: v8(89.204,66.498) 89.907,67.201 v6(89.907,68.739)
  Signal 3 w0.127: R47.2@88.4,66.498 v8(89.204,66.498)
  other v7: 89.204,66.498
  other v10: 89.311,68.739
  other v11: 93.3,73.746
NetQ3_4: Q3.4 R2.1 R56.2 | length 11.3
  Signal 1 w0.127: Q3.4@112.746,69.643 112.746,68.739 v11(112.75,68.739) 113.433,68.739 113.526,68.832 v2(113.6,68.832)
  Signal 1 w0.138: R2.1@113.8,74.5 113.849,74.451 113.849,73.749 v11(113.898,73.7)
  Signal 2 w0.127: v11(112.75,68.739) 112.75,68.743 113.8,69.793 113.8,70.821 114.059,71.08 114.059,73.465 113.898,73.626 v11(113.898,73.7)
  Signal 3 w0.127: R56.2@111.9,66.4 112.021,66.521 112.021,66.816 113.6,68.395 v2(113.6,68.832)
  other v10: 112.75,68.739 113.898,73.7
NetQ4_4: Q4.4 R4.1 R55.2 | length 15.2
  Signal 1 w0.127: v10(108.966,68.739) Q4.4@108.966,69.643
  Signal 1 w0.138: R4.1@112.8,74.5 112.8,74.006 ccw(c113.106,74.006) v10(113.106,73.7)
  Signal 2 w0.127: v6(108.312,68.715) 108.325,68.727 108.954,68.727 v10(108.966,68.739) 112.042,68.739 112.095,68.792 112.095,68.87 112.095,69.01 113.281,70.197 113.281,71.036 113.5,71.255 113.5,73.073 113.158,73.415 113.158,73.648 v10(113.106,73.7)
  Power w0.127: v6(108.312,68.715) 108.312,68.698 108.045,68.43 108.045,68.272 108.05,66.505 v6(108.05,66.4) v8(108.704,66.4)
  Signal 3 w0.127: R55.2@107.9,66.4 v8(108.704,66.4)
  other v7: 108.704,66.4
  other v11: 108.966,68.739 113.106,73.7
NetQ5_4: Q5.4 R9.1 R52.2 | length 11.5
  Signal 1 w0.127: Q5.4@102.87,67.466 v10(102.87,66.562) 103.356,66.562 103.526,66.732 v2(103.6,66.732) ; v10(104,71.6) R9.1@104,72.4
  Signal 2 w0.127: v10(102.87,66.562) 104,67.692 104,68.52 104.132,68.653 104.132,68.873 104,69.005 v10(104,71.6)
  Signal 3 w0.127: R52.2@101.9,64.3 102.045,64.445 102.441,64.445 103.6,65.604 v2(103.6,66.732)
  other v11: 102.87,66.562 104,71.6
NetQ6_4: Q6.4 R6.1 R58.2 | length 11.2
  Signal 1 w0.127: v16(105.8,65.6) 105.809,65.609 106.537,65.609 Q6.4@106.546,65.618
  Signal 1 w0.138: v11(105.6,73.746) R6.1@105.6,74.5
  Signal 2 w0.127: v11(105.6,73.746) 106.295,73.051 106.295,66.095 v16(105.8,65.6)
  Signal 3 w0.127: v16(105.8,65.6) 105.874,65.6 106.074,65.4 R58.2@106.783,65.4
  other v10: 105.6,73.746
NetQ7_4: Q7.4 R10.1 R51.2 | length 15.4
  Signal 1 w0.127: v10(99.09,66.562) Q7.4@99.09,67.466 ; v10(103,71.6) 103,72.378 R10.1@103.001,72.379
  Signal 2 w0.127: v6(98.436,66.562) v10(99.09,66.562) 102.158,66.562 102.201,66.606 102.201,66.839 102.593,67.231 102.786,67.231 103.434,67.878 103.434,71.166 v10(103,71.6)
  Power w0.127: v6(98.436,66.562) 97.788,65.914 97.788,64.762 v6(98.25,64.3) v8(98.904,64.3)
  Signal 3 w0.127: R51.2@98.1,64.3 v8(98.904,64.3)
  other v7: 98.904,64.3
  other v11: 99.09,66.562 103,71.6
NetQ8_4: Q8.4 R8.1 R57.2 | length 20.3
  Signal 1 w0.127: Q8.4@113.307,67.568 v10(114.211,67.568) 114.602,67.568 114.63,67.539 114.757,67.539 114.809,67.487 v16(114.86,67.487)
  Signal 1 w0.138: v10(106.6,73.7) R8.1@106.6,74.5
  Signal 2 w0.127: v10(106.6,73.7) 106.6,67.537 107.219,66.918 109.012,66.918 109.665,66.266 111.256,66.266 112.558,67.568 v10(114.211,67.568) 114.705,67.568 114.786,67.487 v16(114.86,67.487)
  Signal 3 w0.127: R57.2@112.973,66.4 113.07,66.4 114.17,67.5 114.847,67.5 v16(114.86,67.487)
  other v11: 114.211,67.568 106.6,73.7
NetQ9_4: Q9.4 R11.1 R54.2 | length 17.2
  Signal 1 w0.127: R11.1@96.983,72.435 97.001,72.416 v28(97.001,71.679) ; Q9.4@103.431,65.391 103.435,65.395 104.33,65.395 v16(104.335,65.4)
  Signal 2 w0.127: v27@97.001,71.681 97.001,65.717 97.807,64.911 102.056,64.911 102.545,65.4 v16(104.335,65.4)
  Signal 3 w0.127: R54.2@103.089,64.3 103.185,64.3 104.285,65.4 v16(104.335,65.4)
  other v27: 97.001,71.679
NetQ10_4: Q10.4 R12.1 R53.2 | length 12.6
  Signal 1 w0.127: v16(95.518,63.906) 95.925,63.906 96.39,63.441 Q10.4@96.67,63.441 ; R12.1@95.951,72.433 95.953,72.431 v10(95.953,71.679)
  Signal 2 w0.127: v16(95.518,63.906) 96.231,63.906 96.59,64.265 96.59,71.043 v10(95.953,71.679)
  Signal 3 w0.127: v16(95.518,63.906) 96.741,63.45 R53.2@96.942,63.3
  other v11: 95.953,71.679
NetQ11_4: Q11.4 R5.1 R50.2 | length 11.7
  Signal 1 w0.127: v16(85.987,65.618) Q11.4@86.891,65.618 ; v11(86.1,73.746) R5.1@86.1,74.5
  Signal 2 w0.127: v16@85.972,65.603 v16(85.987,65.618) 86.686,66.317 86.686,73.16 v11(86.1,73.746)
  Signal 3 w0.127: v16(85.987,65.618) 86.651,65.618 86.747,65.522 87.317,65.522 R50.2@87.341,65.498
  other v10: 86.1,73.746
NetQ12_4: Q12.4 R7.1 R49.2 | length 17.8
  Signal 1 w0.127: v11(87.1,73.746) R7.1@87.1,74.5 ; Q12.4@93.652,67.568 v16(94.556,67.568)
  Signal 2 w0.127: v11(87.1,73.746) 87.152,73.694 87.152,73.427 87.205,73.375 87.205,67.87 88.157,66.918 92.296,66.918 92.946,67.568 v16(94.556,67.568)
  Signal 3 w0.127: R49.2@93.224,66.498 94.261,66.498 94.556,66.793 v16(94.556,67.568)
  other v10: 87.1,73.746
NetR22_1: R22.1 U7.8 | length 2.1
  Signal 1 w0.3: U7.8@117.225,74.3 117.225,73.068 ccw(c117.3,73.068) v2(117.3,72.993)
  Signal 3 w0.3: R22.1@117.3,72.2 v2(117.3,72.993)
NetR33_2: R33.2 U6.A3 | length 2.1
  Signal 1 w0.138: v2(97.605,97.382) 97.605,97.362 98.047,96.92 U6.A3@98.047,96.9
  Signal 3 w0.3: R33.2@96.425,96.731 96.425,96.781 97.006,97.363 97.586,97.363 v2(97.605,97.382)
NetR39_2: R39.2 U9.6 | length 2.1
  Signal 3 w0.138: U9.6@102.497,76.437 104.01,76.437 104.398,76.825 R39.2@104.398,76.831
NetR40_2: R40.2 U9.7 | length 2
  Signal 3 w0.138: U9.7@102.497,75.937 104.025,75.937 104.369,75.593 R40.2@104.369,75.587
NetR41_2: R41.2 U9.8 | length 11.8
  Signal 1 w0.138: R41.2@97.3,80.921 ccw(c98.28,80.921) 98.28,79.941 100.643,79.941 cw(c100.643,77.401) 103.183,77.401 v1(103.183,74.728)
  Signal 3 w0.138: U9.8@102.497,75.437 102.973,75.437 103.123,75.287 103.123,74.788 v1(103.183,74.728)
NetR46_1: R46.1 U6.F3 | length 1.7
  Signal 1 w0.138: v20(97.67,93.277) U6.F3@98.047,92.9
  Signal 3 w0.138: R46.1@97.6,94.4 97.6,93.347 ccw(c97.67,93.347) v20(97.67,93.277)
"Phase A": R13.1 R59.1 U1.1 | length 9
  Signal 1 w0.138: R13.1@90.043,57.521 90.043,59.48 90.363,59.8 91.743,59.8 92.006,59.537 93.088,59.537 93.259,59.366 U1.1@93.259,58.921
  Signal 3 w0.138: v2(90.043,57.35) 90.297,57.604 R59.1@90.297,60.358
  other v1: 91.538,53.558 92.197,53.558 89.56,54.215 90.219,54.216 90.878,54.216 91.537,54.217 92.196,54.217 88.242,54.873 88.901,54.874 89.56,54.874 90.219,54.875 90.878,54.875 91.537,54.876 92.196,54.876 87.583,55.532 88.242,55.532 88.9,55.533 89.559,55.533 90.218,55.534 90.877,55.534 91.536,55.535 92.195,55.535 86.264,56.19 86.923,56.19 87.582,56.191 88.241,56.191 85.605,56.848 86.264,56.849 86.923,56.849 87.582,56.85 88.241,56.85 84.286,57.506 84.945,57.506 85.604,57.507 86.263,57.507 86.922,57.508 87.581,57.508 88.24,57.509 83.627,58.164 84.286,58.165 84.945,58.165 85.604,58.166 86.263,58.166 86.922,58.167 87.581,58.167 88.24,58.168
"Phase B": R14.1 R60.1 U3.1 | length 8.2
  Signal 1 w0.138: R14.1@99.949,55.362 99.949,57.321 100.269,57.641 101.649,57.641 101.912,57.378 102.994,57.378 U3.1@103.165,57.207
  Signal 3 w0.151: v2(99.913,55.172) ccw(c99.824,55.26) 99.949,55.26 R60.1@99.949,57.845
  other v1: 94.641,52.701 95.3,52.702 95.959,52.702 96.618,52.703 97.277,52.703 97.936,52.704 98.595,52.704 99.254,52.705 99.913,52.705 100.572,52.706 101.231,52.706 101.89,52.707 102.549,52.707 103.208,52.708 103.867,52.708 104.526,52.709 105.185,52.709 105.844,52.71 94.641,53.36 95.3,53.361 95.959,53.361 96.618,53.362 97.277,53.362 97.936,53.363 98.595,53.363 99.254,53.364 99.913,53.364 100.571,53.365 101.23,53.365 101.889,53.366 102.548,53.366 103.207,53.367 103.866,53.367 104.525,53.368 105.184,53.368 105.843,53.369 94.64,54.019 95.299,54.02 95.958,54.02 96.617,54.021 97.276,54.021 97.935,54.022 101.889,54.025 102.548,54.025 103.207,54.026 103.866,54.026 104.525,54.027 105.184,54.027 105.843,54.028 94.64,54.678 95.299,54.679 95.958,54.679 96.617,54.68 97.276,54.68 97.935,54.681 101.888,54.684 102.547,54.684 103.206,54.685 103.865,54.685 104.524,54.686 105.183,54.686 105.842,54.687 94.639,55.337 95.298,55.338 95.957,55.338 96.616,55.338 97.275,55.339 97.934,55.339 101.888,55.342